# Altium PCB PCB1.PcbDoc
Units mil, origin at the board's own origin, x right, y up, seen from the top; angles counter-clockwise.
Board outline 3555 x 3550 mil, 2 copper layers (Top Layer, Bottom Layer); 54 components, 75 nets, 243 pads, 41 vias.
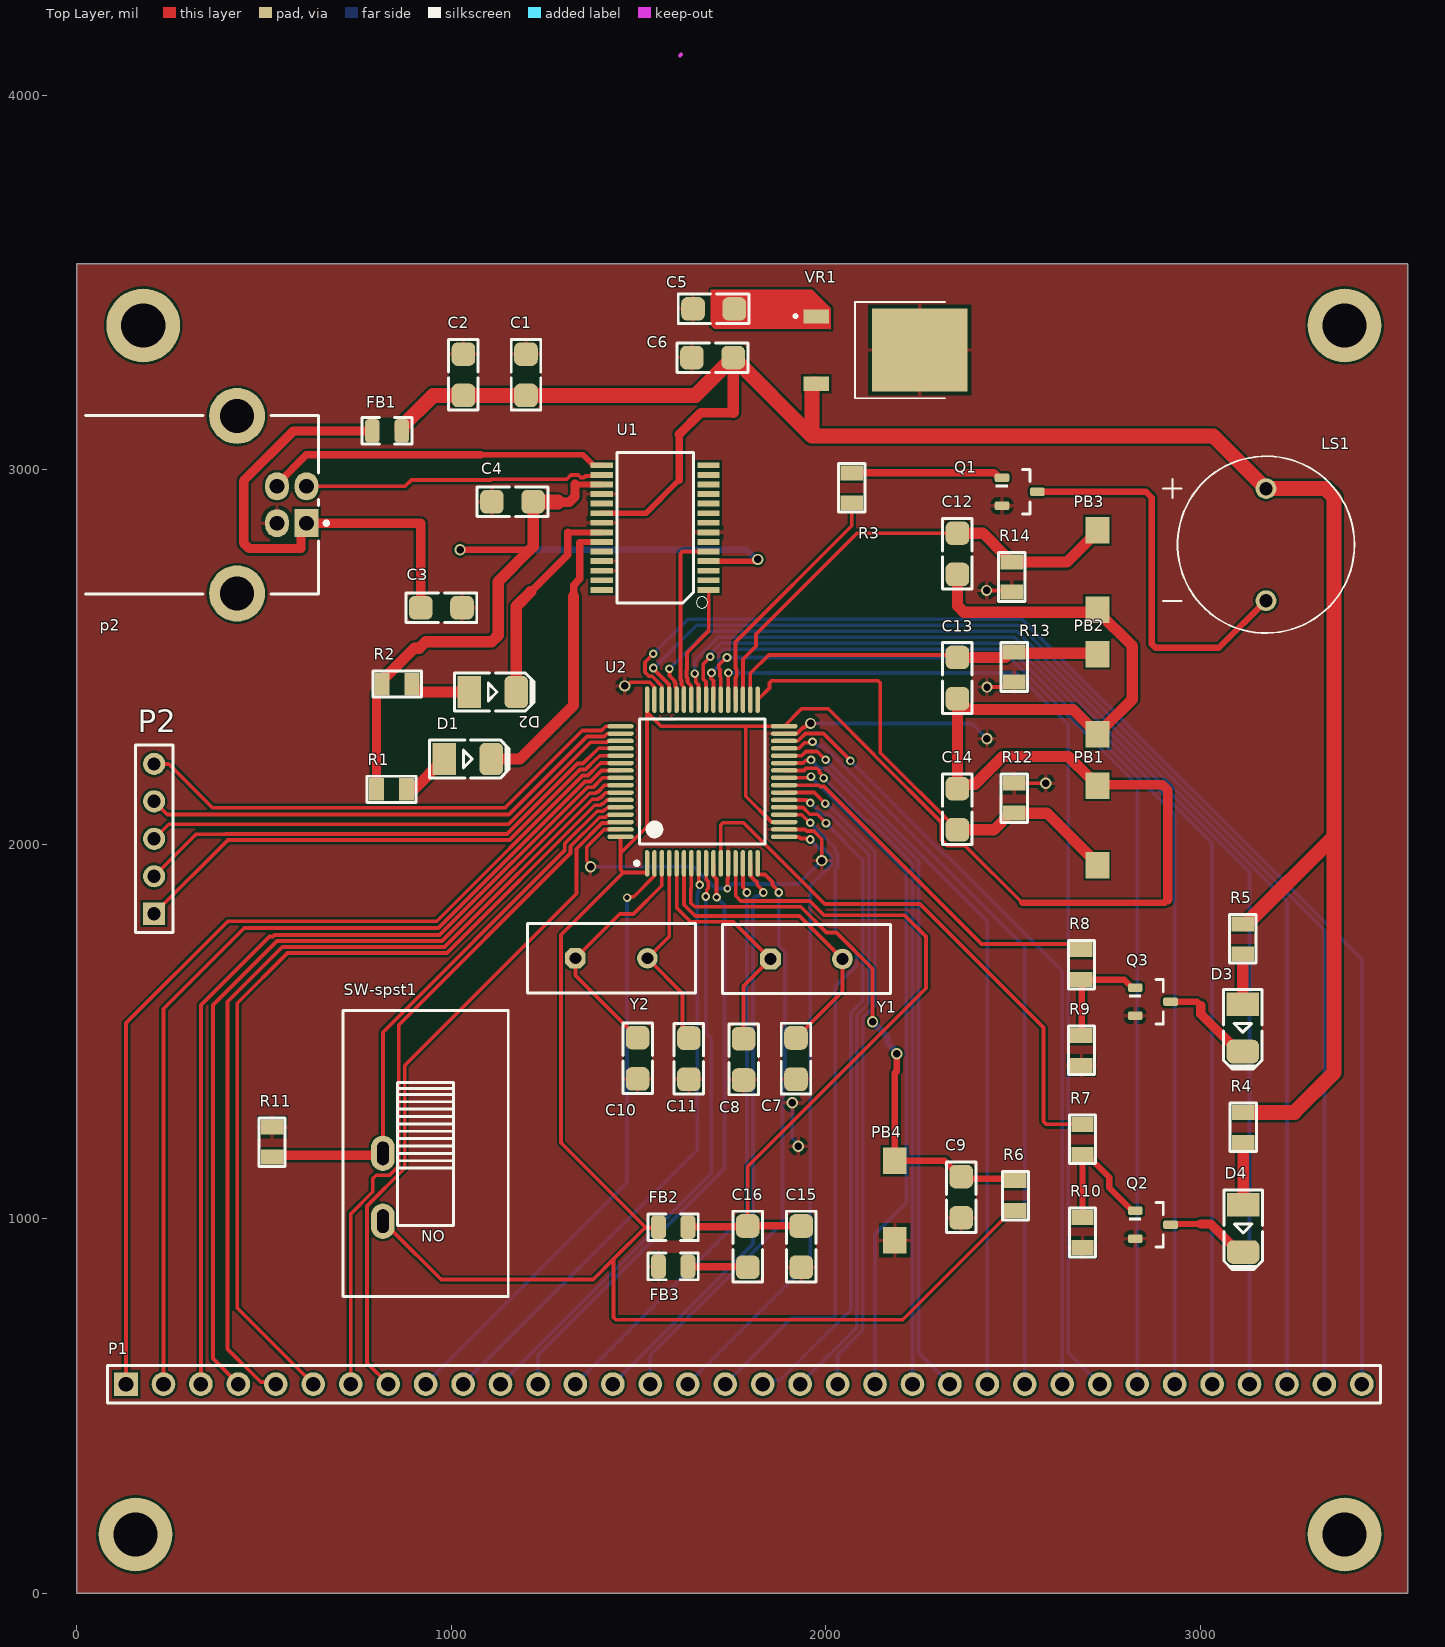
[diagram p0: Top Layer view]
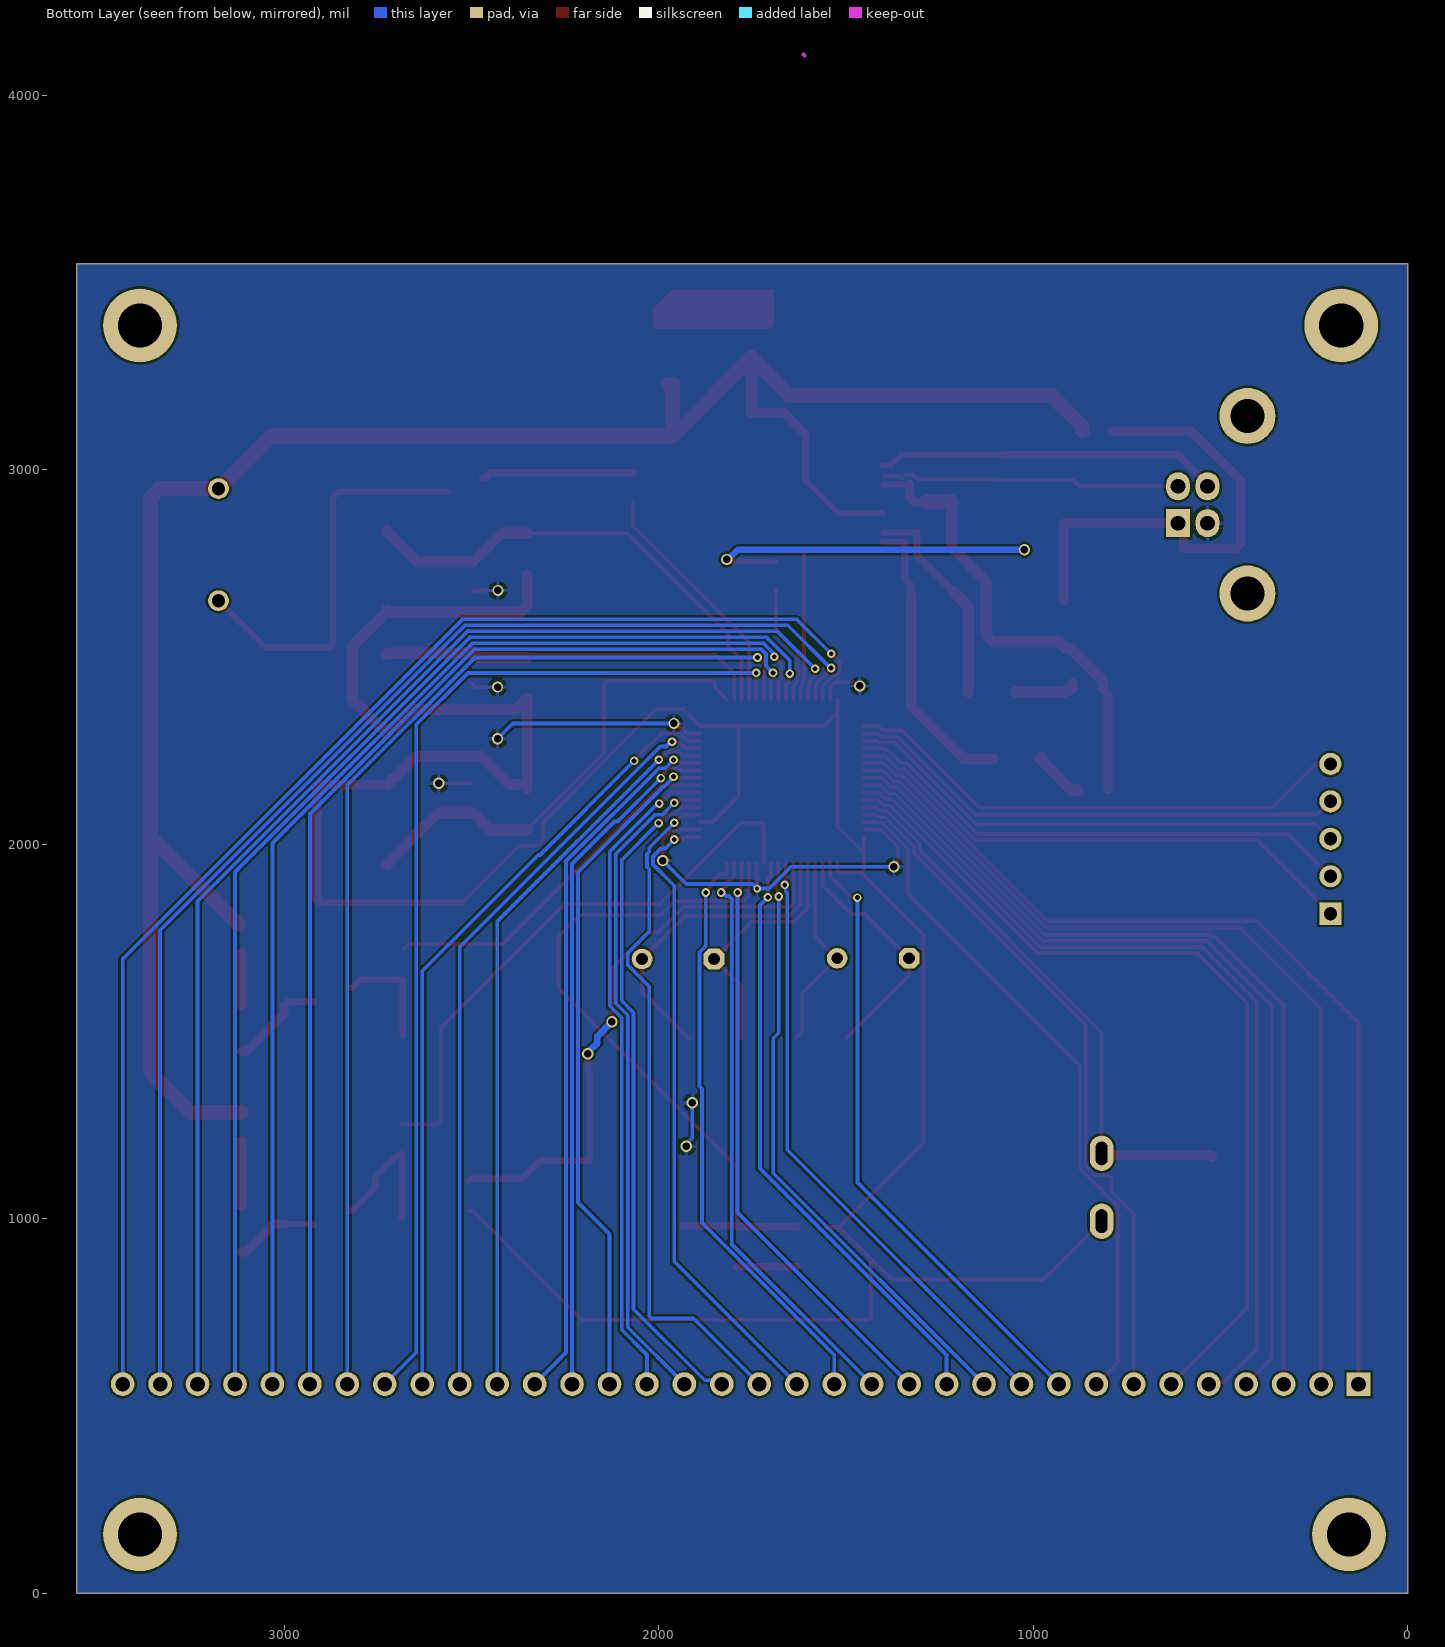
[diagram p1: Bottom Layer view, seen from below]
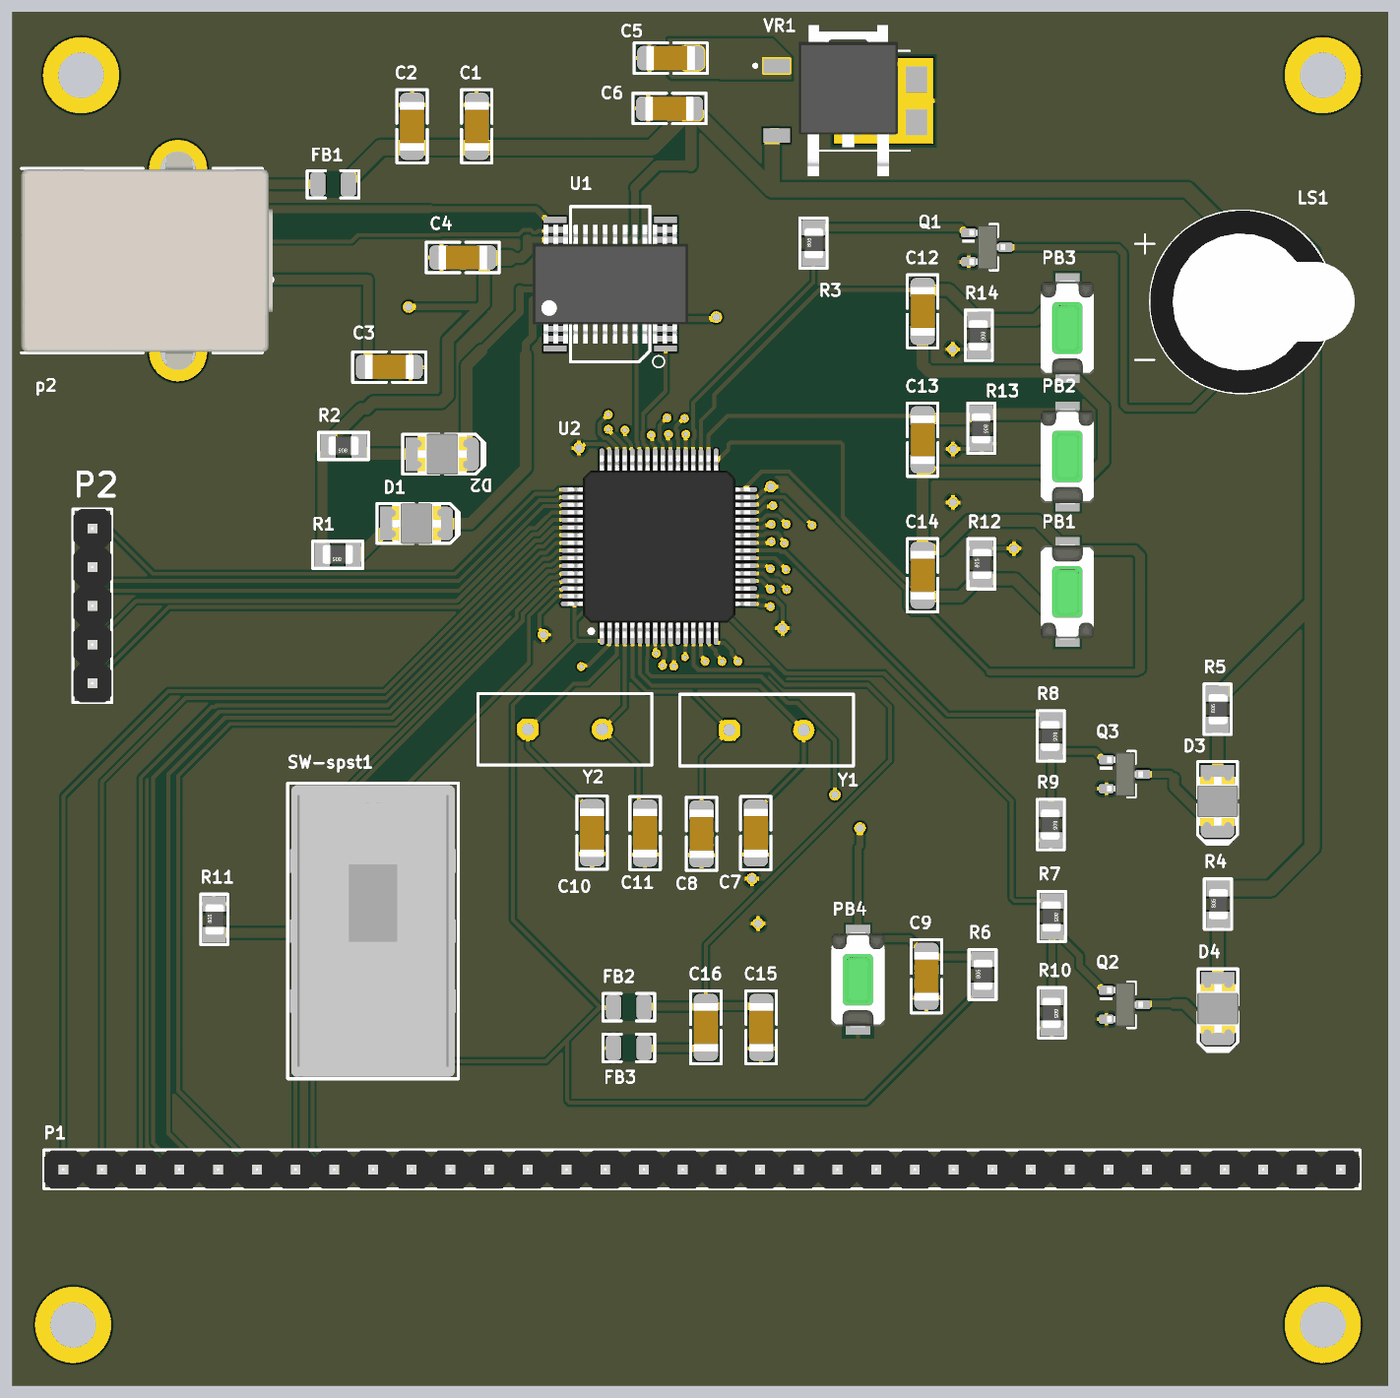
[diagram p2: 3D render of the assembled board from above, using the file's embedded part models]

## Layer stack, top to bottom
Top Solder: solder mask 0.4, Solder Resist, Dk 3.5
Top Layer: signal copper 1.4
Dielectric 1: dielectric 12.6, FR-4, Dk 4.8
Bottom Layer: signal copper 1.4
Bottom Solder: solder mask 0.4, Solder Resist, Dk 3.5

## Board outline
0,0 3555,0 3555,3550 0,3550

## Design rules (kind name [scope] priority, off if disabled: settings)
Clearance [All] p1: gap=5.91 ignorepadtopadclearanceinfootprint=FALSE
HoleSize [All] p1: absolutevalues=TRUE maxlimit=139.37 minlimit=1 maxpercent=80.000 minpercent=20.000
MinimumSolderMaskSliver [All] p1: minsoldermaskwidth=1.57
PolygonConnect [All] p1: connectstyle=Relief reliefconductorwidth=10 reliefentries=4 polygonreliefangle="90 Angle" airgapwidth=10
RoutingVias [All] p1: holewidth=15.75 width=62.99 viastyle="Through Hole" minholewidth=7.87 minwidth=19.68 maxholewidth=31.5 maxwidth=47.24
SilkToSilkClearance [All] p1: silktosilkclearance=5.51
SilkToSolderMaskClearance [IsPad] p1: minsilkscreentomaskgap=0 clearancetoexposedcopper=TRUE
SolderMaskExpansion [All] p1: expansion=4 istentingtop=FALSE
UnRoutedNet [All] p1: checkbadconnections=TRUE
Width [All] p1: maxlimit=40 minlimit=5.91 preferedwidth=9.84 minimp=50.000000 maximp=50.000000 favimp=50.000000
25 further rules are at their usual default settings.

## Components (designator, comment, footprint, x,y, rotation, side; value= is the part's Value field where it differs from the comment)
C1 "Capacitor C SMD 1206" C1206 1200,3254 r90 top value=100nf
C2 "Capacitor C SMD 1206" C1206 1033,3254 r90 top value=4.7uf
C3 "Capacitor C SMD 1206" C1206 974.12,2632 r0 top value=10nf
C4 "Capacitor C SMD 1206" C1206 1164,2915 r180 top value=100nf
C5 "Capacitor C SMD 1206" C1206 1701.12,3430 r0 top value=330nf
C6 "Capacitor C SMD 1206" C1206 1698.12,3300 r0 top value=100nf
C7 "Capacitor C SMD 1206" C1206 1921,1428 r90 top value=18pf
C8 "Capacitor C SMD 1206" C1206 1781,1426 r90 top value=18pf
C9 "Capacitor C SMD 1206" C1206 2362,1057.88 r90 top value=100nf
C10 "Capacitor C SMD 1206" C1206 1498,1429 r90 top value=18pf
C11 "Capacitor C SMD 1206" C1206 1635,1427.88 r90 top value=18pf
C12 "Capacitor C SMD 1206" C1206 2352,2776 r90 top value=100nf
C13 "Capacitor C SMD 1206" C1206 2352,2444.31 r90 top value=100nf
C14 "Capacitor C SMD 1206" C1206 2352,2094.01 r90 top value=100nf
C15 "Capacitor C SMD 1206" C1206 1935,926 r270 top value=10uf
C16 "Capacitor C SMD 1206" C1206 1792,926 r90 top value=100nf
D1 "LED SMD 1210" "LED SMD 1210 (Yellow)" 1044.5,2228 r0 top
D2 "LED SMD 1210" "LED SMD 1210 (Yellow)" 1111.01,2407 r0 top
D3 "LED SMD 1210" "LED SMD 1210 (Yellow)" 3114,1510 r270 top
D4 "LED SMD 1210" "LED SMD 1210 (Yellow)" 3115,974.5 r270 top
FB1 "Inductor SMD NC 0806" L0806 829,3104 r0 top
FB2 "Inductor SMD NC 0806" L0806 1593,978 r0 top
FB3 "Inductor SMD NC 0806" L0806 1593,873 r0 top
LS1 "AI-1223-TWT-5V-R" XDCR_AI-1223-TWT-5V-R 3176,2800.39 r0 top value=1K
P1 "Header 34" "HDR 1X34" 132,559 r0 top
P2 "Header 5" "HDR 1X5" 207,1815 r90 top
p2 "USB" USB2.5-2H4F 23,2907 r180 top
PB1 "SW_PB2" SMD_ALPS_SKQMBBE010 2726.01,2050.7 r90 top
PB2 "SW_PB2" SMD_ALPS_SKQMBBE010 2725.99,2401 r270 top
PB3 "SW_PB2" SMD_ALPS_SKQMBBE010 2725.99,2732.69 r270 top (schematic designator PB?)
PB4 "SW_PB2" SMD_ALPS_SKQMBBE010 2185,1049 r270 top
Q1 "BC817 NPN" SOT-23 2518.24,2941.6 r0 top value=BC817
Q2 "BC817 NPN" SOT-23 2874,984.5 r0 top value=BC817
Q3 "BC817 NPN" SOT-23 2874,1580 r0 top value=BC817
R1 "Resistor SMD 0805" SMD-0805-RES 841,2147 r90 top value=270
R2 "Resistor SMD 0805" SMD-0805-RES 856,2428 r90 top value=270
R3 "Resistor SMD 0805" SMD-0805-RES 2070,2952 r0 top value=10K
R4 "Resistor SMD 0805" SMD-0805-RES 3115,1244.5 r0 top value=680
R5 "Resistor SMD 0805" SMD-0805-RES 3114,1748 r0 top value=680
R6 "Resistor SMD 0805" SMD-0805-RES 2507,1062 r0 top value=10K
R7 "Resistor SMD 0805" SMD-0805-RES 2686,1212.5 r180 top value=10K
R8 "Resistor SMD 0805" SMD-0805-RES 2683,1679 r180 top value=10K
R9 "Resistor SMD 0805" SMD-0805-RES 2683,1450 r180 top value=10K
R10 "Resistor SMD 0805" SMD-0805-RES 2686,963.5 r180 top value=10K
R11 "Resistor SMD 0805" SMD-0805-RES 522,1205 r0 top value=10K
R12 "Resistor SMD 0805" SMD-0805-RES 2504,2123.43 r0 top value=4.7K
R13 "Resistor SMD 0805" SMD-0805-RES 2504,2473.73 r180 top value=4.7K
R14 "Resistor SMD 0805" SMD-0805-RES 2497,2714 r180 top value=4.7K
SW-spst1 "SW SPDT 1" SWSLIDT_SPST_S_19X11 932.17,1175 r90 top
U1 "INTERFACE-FT232RL(SSOP28)" SSOP28-0.65-10.2X5.2MM 1545,2846 r90 top
U2 "STM32F103RET6" STM-LQFP64_N 1671,2168 r90 top
VR1 "LM78M05CDT/NOPB" TO228P991X255-3N 2160,3320 r0 top
Y1 "8MHz" HC-49U 1949,1694 r0 top
Y2 "32.768kHz" HC-49U 1428.06,1696 r0 top

## Footprints (in the part's own frame and the unit in brackets; to place one, negate y for a bottom-side part, rotate by r counter-clockwise, add the part's x,y. Pads: shape width x height; smd on the part's side, far side on the other; paste and mask are expansions set on the pad)
C1206 [mm] "CHIP Capacitor, 3.2X1.6mm, 1206 www.smartw.ir"
  rrect50% 1.6x1.6 smd mask+0.075: 1(-1.4,0) 2(1.4,0)
  Top Layer pour cut-out: -0.8,1 -0.8,-1 0.8,-1 0.8,1
  silkscreen extent -2.4,-1 2.4,1, body extent -1.6,-0.8 1.6,0.8, height 1
HC-49U [mm] "Quartz Crystal, Thru-Hole; 2 Leads; Body 11.35 x 4.65 x 13.46 mm (LxWxH max)"
  oct 1.4x1.4 hole 0.8: 1(-2.44,0)
  round 1.4 hole 0.8: 2(2.44,0)
  silkscreen extent -5.7,-2.35 5.7,2.35
"HDR 1X5" [mm] "Connector; Header; 5 Position"
  rect 1.5x1.5 hole 0.9: 1(0,0)
  round 1.5 hole 0.9: 2(2.54,0) 3(5.08,0) 4(7.62,0) 5(10.16,0)
  silkscreen extent -1.27,-1.27 11.43,1.27, body extent -1.26,-1.27 11.43,1.26, height 8.51
"HDR 1X34" [mm] "Connector; Header; 34 Position"
  rect 1.6x1.6 hole 0.99: 1(0,0)
  round 1.6 hole 0.99: 2(2.54,0) 3(5.08,0) 4(7.62,0) 5(10.16,0) 6(12.7,0) 7(15.24,0) 8(17.78,0) 9(20.32,0) 10(22.86,0) 11(25.4,0) 12(27.94,0) 13(30.48,0) 14(33.02,0) 15(35.56,0) 16(38.1,0) 17(40.64,0) 18(43.18,0) 19(45.72,0) 20(48.26,0) 21(50.8,0) 22(53.34,0) 23(55.88,0) 24(58.42,0) 25(60.96,0) 26(63.5,0) 27(66.04,0) 28(68.58,0) 29(71.12,0) 30(73.66,0) 31(76.2,0) 32(78.74,0) 33(81.28,0) 34(83.82,0)
  silkscreen extent -1.27,-1.27 85.09,1.27, body extent -1.26,-1.27 85.09,1.26, height 8.51
L0806 [mm] "INDUCTOR, FERRITE BEAD, 0805, 2.0X1.6mm (www.Smartw.ir)"
  rrect50% 1x1.6 smd mask+0.075: 1(-1,0) 2(1,0)
  Top Layer pour cut-out: -0.7,0.9 0.7,0.9 0.7,-0.9 -0.7,-0.9
  silkscreen extent -1.7,-0.9 1.7,0.9, body extent -1,-0.8 1,0.8, height 1
"LED SMD 1210 (Yellow)" [mm] "(www.Smartw.ir)"
  rect 1.6x2.2 smd mask+0.075: 1(-1.6,0)
  rrect50% 1.6x2.2 smd mask+0.075: 2(1.6,0)
  Top Layer pour cut-out: -0.8,1.3 -0.8,-1.3 0.8,-1.3 0.8,1.3
  silkscreen extent -2.6,-1.3 2.8,1.3, body extent -1.62,-1.35 1.62,1.35, height 1.1
SMD-0805-RES [mil]
  rect 60x40 smd: 1(0,40) 2(0,-40)
  silkscreen extent -35,-65 35,65, body extent -24,-39 26,39, height 31
SMD_ALPS_SKQMBBE010 [mm] "Vertical 6.0X3.5 mm Compact Type (SurfaceMount) SKQM Series ; Height 5.0 mm ; 50,000 Cycles ; 1.57N Force"
  rect 1.8x1.6 smd mask-1.27: 1(-2.7,0) 2(2.7,0)
  body extent -3.15,-1.75 3.15,1.75, height 5.03
SOT-23 [mm] "SOT23, 3-Leads, Body 2.9x1.3mm, Pitch 0.95mm, Lead Span 2.5mm, IPC Medium Density (www.Smartw.ir)"
  rrect50% 1x0.6 smd: 1(-1.2,0.95) 2(-1.2,-0.95) 3(1.2,0)
  silkscreen extent -1.62,-1.5 0.7,1.5, body extent -1.16,-1.45 1.21,1.45, height 1
SSOP28-0.65-10.2X5.2MM [mm]
  rect 0.4x1.5 smd: 1(-4.225,-3.625) 2(-3.575,-3.625) 3(-2.925,-3.625) 4(-2.275,-3.625) 5(-1.625,-3.625) 6(-0.975,-3.625) 7(-0.325,-3.625) 8(0.325,-3.625) 9(0.975,-3.625) 10(1.625,-3.625) 11(2.275,-3.625) 12(2.925,-3.625) 13(3.575,-3.625) 14(4.225,-3.625) 15(4.225,3.625) 16(3.575,3.625) 17(2.925,3.625) 18(2.275,3.625) 19(1.625,3.625) 20(0.975,3.625) 21(0.325,3.625) 22(-0.325,3.625) 23(-0.975,3.625) 24(-1.625,3.625) 25(-2.275,3.625) 26(-2.925,3.625) 27(-3.575,3.625) 28(-4.225,3.625)
  silkscreen extent -5.46,-3.56 5.1,2.6, body extent -3.9,-5.1 3.9,5.1, height 2
STM-LQFP64_N [mm] "Thin QFP, 64-Leads, Body 10x10mm, Pitch 0.5mm, IPC Medium Density (www.Smartw.ir)"
  oval 1.8x0.3 smd: 1(-5.55,3.75) 2(-5.55,3.25) 3(-5.55,2.75) 4(-5.55,2.25) 5(-5.55,1.75) 6(-5.55,1.25) 7(-5.55,0.75) 8(-5.55,0.25) 9(-5.55,-0.25) 10(-5.55,-0.75) 11(-5.55,-1.25) 12(-5.55,-1.75) 13(-5.55,-2.25) 14(-5.55,-2.75) 15(-5.55,-3.25) 16(-5.55,-3.75) 33(5.55,-3.75) 34(5.55,-3.25) 35(5.55,-2.75) 36(5.55,-2.25) 37(5.55,-1.75) 38(5.55,-1.25) 39(5.55,-0.75) 40(5.55,-0.25) 41(5.55,0.25) 42(5.55,0.75) 43(5.55,1.25) 44(5.55,1.75) 45(5.55,2.25) 46(5.55,2.75) 47(5.55,3.25) 48(5.55,3.75)
  oval 0.3x1.8 smd: 17(-3.75,-5.55) 18(-3.25,-5.55) 19(-2.75,-5.55) 20(-2.25,-5.55) 21(-1.75,-5.55) 22(-1.25,-5.55) 23(-0.75,-5.55) 24(-0.25,-5.55) 25(0.25,-5.55) 26(0.75,-5.55) 27(1.25,-5.55) 28(1.75,-5.55) 29(2.25,-5.55) 30(2.75,-5.55) 31(3.25,-5.55) 32(3.75,-5.55) 49(3.75,5.55) 50(3.25,5.55) 51(2.75,5.55) 52(2.25,5.55) 53(1.75,5.55) 54(1.25,5.55) 55(0.75,5.55) 56(0.25,5.55) 57(-0.25,5.55) 58(-0.75,5.55) 59(-1.25,5.55) 60(-1.75,5.55) 61(-2.25,5.55) 62(-2.75,5.55) 63(-3.25,5.55) 64(-3.75,5.55)
  silkscreen extent -5.67,-4.25 4.25,4.57, body extent -6,-6 6,6, height 1.6
SWSLIDT_SPST_S_19X11 [mm] "Switch, Slide, SPST, Straight, THD, 19X11mm (www.Smartw.ir)"
  oval 2.4x1.6 hole 0.8 slot 1.6 at 0 deg: 1(-4.6,2.9) 2(0,2.9)
  silkscreen extent -9.7,-5.6 9.7,5.6, body extent -9.56,-5.45 9.56,5.45, height 14.11
TO228P991X255-3N [mm]
  rect 1.73x0.96 smd: 1(-4.7,2.285) 3(-4.7,-2.285)
  rect 6.49x5.63 smd paste-4: 4(2.32,0)
  silkscreen extent -6.2,-3.27 4.04,3.27, body extent -3.27,-4.95 3.27,4.95, height 2.55
USB2.5-2H4F [mm] "Connector; USB1.1, Type B, Thru-Hole; 4 Position; Right Angle"
  rect 1.6x1.9 hole 1: 1(-15.01,1.25)
  oval 1.6x1.9 hole 1: 2(-15.01,-1.25) 3(-13.01,-1.25) 4(-13.01,1.25)
  round 3.8 hole 2.3: 5(-10.3,6.02) 6(-10.3,-6.02)
  silkscreen extent -16.49,-6.05 -0.02,6.05, body extent -16.51,-7.45 -0.01,7.45, height 10.95
XDCR_AI-1223-TWT-5V-R [mm]
  round 1.408 hole 0.9: N(0,-3.8) P(0,3.8)
  silkscreen extent -6.98,-6 6,6, body extent -6.01,-6 7.43,6, height 5.36

## Part data
LS1: "INDICATOR 5VDC 85DB 2300HZ", Package="2225 PUI Audio", Check_prices=https://www.snapeda.com/parts/AI-1223-TWT-5V-R/PUI+Audio%252C+Inc./view-part/?ref=eda, MF="PUI Audio", MP=AI-1223-TWT-5V-R, SnapEDA_Link=https://www.snapeda.com/parts/AI-1223-TWT-5V-R/PUI+Audio%252C+Inc./view-part/?ref=snap
P1: "Header, 34-Pin", ComponentLinkp-URL=https://www.smartw.ir/
P2: "Header, 5-Pin", ComponentLinkp-URL=https://www.smartw.ir/, DatasheetVersion=2020
p2: "USB Connector-B Type", ComponentLink1Description="Website Smart World", ComponentLink1URL=https://www.smartw.ir/, ComponentLink2Description=Telegram, ComponentLink2URL=https://t.me/altium_smartw, ComponentLink3Description=Instagram, ComponentLink3URL=https://Instagram.com/smartgw.ir, DatasheetVersion=2021
PB1 PB2 PB3 PB4: "2 Pin Push Button Switch", Category=MISC, Company="SJ Libraries", ComponentLink1Description=Datasheet, Designer="Eng. Saeid Jorablo", HelpURL=http://s3.picofile.com/file/7443264187/Coming_Soon_logo.gif, Mounting Technology="Surface Mount\Through-Hole", Pin Count=0, Update Date=6/3/2012
Q1 Q2 Q3: "BJT, NPN, 45v, 0.5A, SMD, SOT23", ComponentLink1Description="Website Smart World", ComponentLink1URL=https://www.smartw.ir/, ComponentLink2Description=Telegram, ComponentLink2URL=https://t.me/altium_smartw, ComponentLink3Description=Instagram, ComponentLink3URL=https://Instagram.com/smartgw.ir, DatasheetVersion=2021
SW-spst1: "Toggle SPDT Switch with Body Hole", ComponentLink1Description="Website Smart World", ComponentLink1URL=https://www.smartw.ir/, ComponentLink2Description=Telegram, ComponentLink2URL=https://t.me/altium_smartw, ComponentLink3Description=Instagram, ComponentLink3URL=https://Instagram.com/smartgw.ir, DatasheetVersion=2021
U1: "USB-Ð¼Ð¾ÑÑ‚, Ð¸Ð½Ñ‚ÐµÑ€Ñ„ÐµÐ¹Ñ USB Ðº UART USB 2.0 UART 28-SSOP", Package="SSOP-28 FTDI", Availability="Not in stock", Check_prices=https://www.snapeda.com/parts/FT232RL/FTDI%252C+Future+Technology+Devices+International+Ltd/view-part/?ref=eda, MF="FTDI, Future", MP=FT232RL, Price=None, SnapEDA_Link=https://www.snapeda.com/parts/FT232RL/FTDI%252C+Future+Technology+Devices+International+Ltd/view-part/?ref=snap
U2: "ARM Cortex-M3 32-bit MCU, 512 KB Flash, 64 KB Internal RAM, 51 I/Os, 64-pin LQFP, -40 to 85 degC, Tray", ComponentLink1Description="Website Smart World", ComponentLink1URL=https://eshop.eca.ir/stm/1234-%D9%85%DB%8C%DA%A9%D8%B1%D9%88%DA%A9%D9%86%D8%AA%D8%B1%D9%84%D8%B1-stm32f103ret6.html, ComponentLink2Description="New link"
VR1: "500-mA, 35-V, linear voltage regulator for 5 V 3-TO-252 -40 to 125", Package="TO-252-3 Texas Instruments", Availability=Good, Check_prices=https://www.snapeda.com/parts/LM78M05CDT/Texas%20Instruments/view-part/563725/?ref=eda, MF="Texas Instruments", MP=LM78M05CDT, Price=None, Purchase-URL=https://pricing.snapeda.com/search/part/LM78M05CDT/?ref=eda, SnapEDA_Link=https://www.snapeda.com/parts/LM78M05CDT/Texas%20Instruments/view-part/563725/?ref=snap
Y1 Y2: library part ECS-44-20-1, "Crystal Oscillator", ComponentLink1Description="Manufacturer Link", ComponentLink1URL=http://www.ecsxtal.com/, ComponentLink2Description=Datasheet, ComponentLink2URL=http://www.ecsxtal.com/pdf2/HC49U.PDF, DatasheetDocument=18-Apr-2000, PackageReference=HC-49U, Published=17-Jul-2002, Publisher="Altium Limited"
C1 C2 C3 C4 C5 C6 C7 C8 C9 C10 C11 C12 C13 C14 C15 C16 D1 D2 D3 D4 R1 R2 R3 R4 R5 R6 R7 R8 R9 R10 R11 R12 R13 R14: ComponentLink1Description="Website Smart World", ComponentLink1URL=https://www.smartw.ir/, ComponentLink2Description=Telegram, ComponentLink2URL=https://t.me/altium_smartw, ComponentLink3Description=Instagram, ComponentLink3URL=https://Instagram.com/smartgw.ir, DatasheetVersion=2021
FB1 FB2 FB3: ComponentLink1Description="Website Smart World", ComponentLink1URL=https://www.smartw.ir/, ComponentLink2Description=Telegram, ComponentLink2URL=https://t.me/altium_smartw, ComponentLink3Description=Instagram, ComponentLink3URL=https://Instagram.com/smartgw.ir, DatasheetVersion=2021, FERRIT=FERRIT

## Free pads (board coordinates)
  round 196.85 hole 118.11: 1(178,3385.83) 2(157.48,157.48) 3(3385.83,157.48) 4(3385.83,3385.83)

## Via types
v1: diameter 23, hole 13, Top Layer to Bottom Layer, 26 vias
v2: diameter 30, hole 20, Top Layer to Bottom Layer, 14 vias
v3: diameter 20, hole 11, Top Layer to Bottom Layer, 1 vias

## Nets (pads, with @x,y where several pads share a name; then routed paths per layer and width w, separated by ;. In a path a pad name is that pad's centre, name@x,y a point inside that pad or via, vN(x,y) a via of type N, cw(c..) or ccw(c..) an arc to the next point about the centre after c; other vN are vias at no path point)
3V3A: C15.1 C16.2 FB2.2 U2.13 | length 1913.8
  Top Layer w10: U2.13 1759.93,1949.15 1759.93,1862.86 1773.6,1849.19 1957.81,1849.19 1996,1811 2211,1811 2267.91,1754.09 2267.91,1615.91 1792,1140 C16.2
  Top Layer w20: FB2.2 1633.93,979.56 1790.44,979.56 C16.2 C15.1
+3V3: C12.1 C13.1 C14.2 FB2.1 PB1.2 PB2.2 PB3.2 R6.2 SW-spst1.1 U2.1 U2.19 U2.32 U2.48 U2.64 | length 8460.5
  Top Layer w10: SW-spst1.1 818,992.49 842.48,968.01 843.89,968.01 973.49,838.41 1379.35,838.41 1434,893.06 ; U2.64 1452.5,1976.4 ; 1518.94,975 1550.63,975 FB2.1 1518.94,978 ; U2.1 1523.36,1925.8 1522.53,1924.97 1459.97,1924.97 ; U2.19 1889.16,2060.08 1855.54,2060.08 1787,2128.62 1787,2315.64 ; R6.2 2497,1022 2206,731 1439.86,731 1434,736.86 1434,893.06 ; 2525,1844 2372.51,1996.49 2325.21,1996.49 2309.6,2012.1 2309.6,2058.8 2130.09,2238.3 2130.09,2238.91 2007,2362 1935.87,2362 U2.32 1787,2315.64 ; 1434,893.06 1518.94,978 ; 1452.5,1976.4 1523.36,2047.27 U2.48 1523.71,2386.16 1523.71,2352.54 1560.61,2315.64 1787,2315.64 ; 1452.5,1976.4 1452.5,1932.44 1459.97,1924.97 ; 1459.97,1924.97 1293.54,1758.54 1293.54,1203.41 1518.94,978
  Top Layer w17: 2525,1844 2906,1844 2914.03,1852.03
  Top Layer w25: PB1.2@2726,2158.97 2899.39,2158.97 2914.03,2144.32 2914.03,1852.03
  Top Layer w30: C12.1 2352,2637.57 2369.57,2620 2719.61,2620 PB3.2 ; PB1.2 2726,2158.97 2726,2160.94 2709.5,2177.43 2705.57,2177.43 2648,2235 2473,2235 2398.27,2160.27 2363.14,2160.27 C14.2 C13.1 2352.4,2389.19 2381.59,2360 2660.7,2360 2705.57,2315.13 2709.5,2315.13 PB2.2@2726,2298.64 ; PB2.2 PB2.2@2726,2298.64 ; PB3.2@2726,2622.46 2819,2529.46 2819,2387.7 2746.43,2315.13 2742.5,2315.13 PB2.2@2726,2298.64
+5V0: C1.1 C2.1 C6.2 FB1.2 LS1.P R4.1 R5.1 U1.20 VR1.3 | length 5717.3
  Top Layer w15: U1.20 1520.39,2884.39 1609,2973
  Top Layer w20: 1609,2973 1609,3095
  Top Layer w25: 1609,3095 1667,3153 1753,3153
  Top Layer w30: 1753,3153 1753.24,3153.24 C6.2
  Top Layer w40: FB1.2 868.37,3115.18 952.07,3198.88 C2.1 C1.1 1652.12,3198.88 C6.2 1963.24,3090 ; VR1.3 1964.34,3230.04 1963.24,3228.94 1963.24,3090 ; R4.1 3251.5,1284.5 3358,1391 3358,2022 ; R5.1@3124,1788 3358,2022 ; 1963.24,3090 3036,3090 LS1.P 3334.57,2950 3358,2926.57 3358,2022
+12: C5.2 VR1.1
BUZZER: R3.2 U2.36 | length 656.7
  Top Layer w10: U2.36 1759.58,2445.59 1762.72,2448.72 1762.72,2467.28 1759.58,2470.41 1759.58,2540.58 2070,2851 R3.2
GND: C1.2 C2.2 C3.2 C4.2 C5.1 C6.1 C7.1 C8.1 C9.1 C10.1 C11.1 C15.2 FB3.1 p2.4 PB4.2 Q1.2 Q2.2 Q3.2 R9.1 R10.1 R11.1 R12.1 R13.1 R14.1 U1.7 U1.18 U1.21 U1.25 U1.26 U2.12 U2.18 U2.31 U2.47 U2.63 VR1.4 | length 2118.3
  Top Layer w10: v2(1372.47,1940.29) 1372.47,1945.68 1362,1956.15 1362,1993 1409.05,2040.05 U2.63@1449,2040.05 ; v2(1464,2423) 1469.41,2423 1479.25,2432.84 1530.33,2432.84 1542.7,2420.47 1542.7,2386.85 U2.47 ; v3(1738,1882) 1738,1907 1739.55,1908.55 1739.55,1949.15 U2.12 ; U2.18 1945.27,2040.05 1949.72,2035.59 1968.28,2035.59 1990,2013.88 v2(1990,1957) ; U2.31 1889.85,2296.3 1923.47,2296.3 1939.48,2312.31 1943.9,2312.31 1954.59,2323 v2(1960,2323) ; v2(2430,2678) 2493,2678 R14.1 ; v2(2431,2420) 2490.27,2420 R13.1 ; R12.1 2504.43,2163 v2(2588,2163)
  Bottom Layer w10: v2(1372.47,1940.29) 1647.39,1940.29 1705.69,1882 v3(1738,1882) 1750,1894 1927,1894 v2(1990,1957) ; v2(1911,1310) 1911,1215.41 1927,1199.41 v2(1927,1194) ; v2(1960,2323) 2390.17,2323 v2(2430.82,2282.36)
LED1: R7.2 U2.11 | length 1551.5
  Top Layer w10: U2.11 1720.21,2052.14 1726.07,2058 1781,2058 1998,1841 2252,1841 2582,1511 2582,1260 2589.5,1252.5 R7.2
LED2: R8.2 U2.24 | length 975.4
  Top Layer w10: U2.24 1981.98,2158.16 1985.63,2154.5 1995.5,2154.5 2416,1734 2668,1734 R8.2
mcu_boot0: R11.2 SW-spst1.2 U2.60 | length 1517.4
  Top Layer w10: SW-spst1.2 818,1498.22 1303.19,1983.41 1303.19,2001.67 1390.19,2088.67 1405.64,2088.67 1409.42,2092.45 1411.93,2092.45 1418.24,2098.76 1452.15,2098.76 U2.60
  Top Layer w25: R11.2 527,1170 813,1170 SW-spst1.2
mcu_nrst: C9.2 PB4.1 R6.1 U2.7 | length 1550.3
  Top Layer w10: U2.7 1641.47,1882.02 1640.12,1880.67 1640.12,1843.56 1650.39,1833.28 1933.72,1833.28 2002.36,1764.64 2028.82,1764.64 2125.34,1668.12 v2(2125.34,1526.66)
  Top Layer w18: v2(2190.19,1441) 2190.19,1395.18 2185.01,1390 PB4.1 2317.94,1155.3 2360.24,1113 C9.2 2367.5,1107.5 2501.5,1107.5 R6.1
  Bottom Layer w18: v2(2125.34,1526.66) 2164.53,1487.47 2164.53,1469.9 2190.19,1444.25 v2(2190.19,1441)
MCU_RX1: U1.5 U2.43 | length 471.3
  Top Layer w10: U2.43 1621.44,2386.85 1621.44,2420.47 1615.13,2426.77 1615.13,2437.38 1612.38,2440.13 1612.38,2776.17 1618.24,2782.02 U1.5
MCU_TX1: U1.1 U2.42 | length 323.2
  Top Layer w10: U2.42 1641.13,2386.85 1641.13,2423.28 1631.04,2433.36 1631.04,2443.96 1628.28,2446.72 1628.28,2465.28 1629.91,2466.9 1629.91,2511.97 1687.72,2569.78 U1.1
NetC3_1: C3.1 FB1.1 p2.1 | length 1312
  Top Layer w25: FB1.1 579,3104 446,2971 446,2804.64 460.64,2790 599.3,2790 599.3,2843.14 p2.1 918.88,2857.79 C3.1@918.88,2649
NetC7_2: C7.2 U2.6 Y1.2 | length 855.9
  Top Layer w10: U2.6 1622.13,1949.15 1622.13,1839.05 1652.1,1809.08 1706.92,1809.08 1929.98,1809.08 Y1.2 2045.06,1607.18 C7.2
NetC8_2: C8.2 U2.5 Y1.1 | length 668.8
  Top Layer w10: U2.5 1602.45,1949.15 1602.45,1830.55 1639.82,1793.18 1753.76,1793.18 Y1.1 1781,1622.06 C8.2
NetC10_2: C10.2 U2.3 Y2.1 | length 651.4
  Top Layer w10: C10.2 1332,1650.12 Y2.1 1450.33,1814.33 1487.33,1814.33 1562.39,1889.39 1562.39,1949.15 U2.3
NetC11_2: C11.2 U2.4 Y2.2 | length 536.6
  Top Layer w10: U2.4 1582.42,1754.29 Y2.2 1618,1602.13 1618,1500 C11.2
NetC16_1: C16.1 FB3.2 | length 160.5
  Top Layer w20: FB3.2 1633.43,871.94 1790.94,871.94 C16.1
NetD1_1: D1.1 R1.2 | length 143
  Top Layer w30: R1.2 885,2143 896.51,2143 D1.1 D1.1@977.51,2232
NetD1_2: D1.2 U1.23 | length 779.1
  Top Layer w15: 1344,2805 1346.61,2807.61 U1.23
  Top Layer w20: 1327,2663 1327,2692 1344,2709 1344,2805
  Top Layer w30: D1.2 1183.99,2228 1327,2371.01 1327,2663
NetD2_1: D2.1 R2.2 | length 166.6
  Top Layer w30: R2.2 896,2418 901,2413 911,2413 917,2407 D2.1
NetD2_2: D2.2 U1.22 | length 574.1
  Top Layer w15: 1311,2833 1402.08,2833 U1.22
  Top Layer w20: 1213,2675 1311,2773 1311,2833
  Top Layer w30: D2.2 1174,2636 1213,2675
NetD3_1: D3.1 R5.2 | length 135
  Top Layer w30: D3.1 R5.2
NetD3_2: D3.2 Q3.3 | length 261.2
  Top Layer w17: Q3.3 2992,1580 3002,1570
  Top Layer w25: 3002,1570 3002,1547.2 3102.19,1447.01 D3.2
NetD4_1: D4.1 R4.2 | length 167
  Top Layer w30: D4.1 R4.2
NetD4_2: D4.2 Q2.3 | length 225.6
  Top Layer w17: Q2.3 2923.24,986.5 3002,986.5
  Top Layer w25: 3002,986.5 3028.2,986.5 3103.19,911.51 D4.2
NetLS1_N: LS1.N Q1.3 | length 1064.2
  Top Layer w17: Q1.3 2855.4,2941.6 2861.98,2935.02 2871,2926 2871,2534.96 2880.96,2525 3050.21,2525 LS1.N
Netp2_2: p2.2 U1.16 | length 806.7
  Top Layer w9.84: p2.2 877.21,2956.21 894.17,2973.17 1105.61,2973.17 1107.44,2975 1309.01,2975 1320.34,2986.33 1339.66,2986.33 1346.5,2979.48 1354.66,2979.48 1358.97,2983.8 1399.33,2983.8 U1.16
Netp2_3: p2.3 U1.15 | length 920.8
  Top Layer w9.84: 1079.18,3040.18 1082,3043
  Top Layer w15: 1079.18,3040.18 1352.79,3040.18 1380.63,3012.34 U1.15
  Top Layer w20: p2.3 535.2,2962.12 613.27,3040.18 1079.18,3040.18
NetQ1_1: Q1.1 R3.1 | length 406.4
  Top Layer w20: R3.1 2450.13,2992 2463.13,2979 Q1.1
NetQ2_1: Q2.1 R7.1 R10.2 | length 388.4
  Top Layer w17: R10.2 R7.1 2696,1172.5 2757.6,1110.91 2757.6,1083.19 2818.88,1021.91 Q2.1
NetQ3_1: Q3.1 R8.1 R9.2 | length 304.5
  Top Layer w17: R9.2 2684,1489 2684,1638 R8.1 2797.28,1639 2818.88,1617.4 Q3.1
PA0: P1.13 U2.14 | length 1584.7
  Top Layer w10: U2.14 1779.27,1885.84 1790,1875.11 v1(1790,1871.59)
  Bottom Layer w10: P1.13 1790,1017 v1(1790,1871.59)
PA1: P1.14 U2.15 | length 1580.9
  Top Layer w10: P1.14@1431,558 P1.14 ; U2.15 1799.3,1949.15 1799.3,1915.53 1813.09,1901.74 1815.26,1901.74 1817.43,1899.57 1817.43,1891.68 1834,1875.11 v1(1834,1871.59)
  Bottom Layer w10: P1.14 1805.91,932.91 1805.91,1854.91 1813.04,1862.04 1820.92,1862.04 1830.48,1871.59 v1(1834,1871.59)
PA2: P1.15 U2.16 | length 1582
  Top Layer w10: P1.15 P1.15@1533,558 ; U2.16 1818.64,1920.46 1819.47,1919.62 1838.38,1919.62 1858.43,1899.57 1858.43,1891.68 1875,1875.11 v1(1875,1871.59)
  Bottom Layer w10: P1.15 1532,636.51 1885.09,989.6 1885.09,1347.8 1891.4,1354.1 1891.4,1712.3 1875,1728.7 v1(1875,1871.59)
PA3: P1.16 U2.17 | length 1716
  Top Layer w10: U2.17 1889.85,2020.02 1928.66,2020.02 1932.99,2015.68 1956.51,2015.68 v1(1959,2013.19)
  Bottom Layer w10: P1.16 1959,886 1959,1889.36 2015.91,1946.27 2015.91,1967.73 1994.42,1989.22 1982.97,1989.22 v1(1959,2013.19)
PA4: P1.17 U2.20 | length 1845.6
  Top Layer w10: U2.20 1936.4,2079.42 1957.82,2058 v1(1959,2058)
  Bottom Layer w10: P1.17 1907,734 2020.14,734 2026,739.86 2026,1620.54 2083.53,1678.07 2083.53,1709.93 2026,1767.46 2026,1933.87 2031.81,1939.68 2031.81,1974.32 2026,1980.13 2026,1991 v1(1959,2058)
PA5: P1.18 U2.21 | length 1799.4
  Top Layer w10: U2.21 1889.85,2098.76 1939.56,2098.76 1957.91,2080.41 1977.59,2080.41 v1(2001,2057)
  Bottom Layer w10: P1.18 1842.14,569.14 1877.78,569.14 2067.62,758.99 2067.62,1550.57 2099.43,1582.38 2099.43,1958.57 v1(2001,2057)
PA6: P1.19 U2.22 | length 1777
  Top Layer w10: U2.22 1947.69,2118.79 1955.48,2111 v1(1959,2111)
  Bottom Layer w10: P1.19 2083.53,710.53 2083.53,1543.98 2115.34,1575.79 2115.34,1974.35 2010.28,2079.41 1990.59,2079.41 v1(1959,2111)
PA7: P1.20 U2.23 | length 1770
  Top Layer w10: U2.23 1969.53,2138.47 v1(1999,2109)
  Bottom Layer w10: v1(1999,2109) 2001.49,2106.51 2005.67,2106.51 2131.24,1980.94 2131.24,1569.2 2099.43,1537.39 2099.43,703.94 2032,636.51 P1.20
PA8: P1.31 U2.41 | length 3242.9
  Top Layer w10: v1(1650.69,2456) 1653.18,2453.51 1653.18,2433.72 1660.81,2426.08 1660.81,2386.85 U2.41
  Bottom Layer w10: v1(1650.69,2456) 1650.69,2491.38 1712.53,2553.22 2504.76,2553.22 3132,1925.97 P1.31
PA11: P1.32 U2.44 | length 3368.9
  Top Layer w10: v1(1583,2469) 1583,2450.49 1596.47,2437.02 1596.47,2433.71 1597.98,2432.2 1597.98,2432.04 1599.23,2430.79 1599.23,2419.4 1602.1,2416.52 U2.44
  Bottom Layer w10: v1(1583,2469) 1683.12,2569.12 2511.35,2569.12 3232,1848.47 P1.32
PA12: P1.33 U2.45 | length 3490
  Top Layer w10: v1(1540.29,2470.9) 1540.29,2468.71 1582.07,2426.93 1582.07,2386.85 U2.45
  Bottom Layer w10: v1(1540.29,2470.9) 1541.9,2470.9 1656.03,2585.03 2517.93,2585.03 3332,1770.96 P1.33
PA13: P1.34 U2.46 | length 3595.8
  Top Layer w10: v1(1540,2509) 1517.59,2486.59 1517.59,2459.72 1528.57,2448.75 1536.91,2448.75 1562.39,2423.28 1562.39,2386.85 U2.46
  Bottom Layer w10: v1(1540,2509) 1631.93,2600.93 2524.52,2600.93 3432,1693.46 P1.34
PA14: P2.5 U2.49 | length 1384.1
  Top Layer w10: P2.5 246,2215 363,2098 1144,2098 1350.3,2304.3 1401.92,2304.3 1412.92,2315.29 1452.15,2315.29 U2.49
PA15: P2.4 U2.50 | length 1349.4
  Top Layer w10: P2.4 242,2080 1154.31,2080 1362.7,2288.39 1408.51,2288.39 1415.72,2295.61 1452.15,2295.61 U2.50
PB0: P1.22 U2.26 | length 1844.5
  Top Layer w10: U2.26 1942.14,2197.53 1948.01,2203.41 1976.59,2203.41 1983.67,2196.33 1983.67,2191.67 1994.91,2180.43 v1(1994.91,2176.91)
  Bottom Layer w10: v1(1994.91,2176.91) 2110.61,2061.21 2118.79,2061.21 2232,1948 P1.22
PB1: P1.23 U2.27 | length 1905.3
  Top Layer w10: U2.27 1939.33,2217.21 1945.44,2223.32 1958.51,2223.32 v1(1961,2225.81)
  Bottom Layer w10: v1(1961,2225.81) 1983.41,2203.41 2000.1,2203.41 2247.91,1955.6 2247.91,643.09 P1.23
PB2: P1.24 U2.28 | length 1970.3
  Top Layer w10: U2.28 1936.52,2236.9 1947.84,2248.22 1977.78,2248.22 v1(2000,2226)
  Bottom Layer w10: v1(2000,2226) 2432,1794 P1.24
PB3: P1.2 U2.55 | length 2486.2
  Top Layer w10: P1.2 232,1561 448,1777 966.05,1777 1357.25,2168.2 1372.2,2168.2 1401.53,2197.53 U2.55
PB4: P1.3 U2.56 | length 2383.9
  Top Layer w10: P1.3 332,1571 515,1754 524.51,1754 528.41,1757.91 969.45,1757.91 1363.84,2152.29 1378.78,2152.29 1404.34,2177.84 U2.56
PB5: P1.4 U2.57 | length 2371.9
  Top Layer w10: P1.4 364,627 364,1571 535,1742 976.04,1742 1370.42,2136.39 1385.87,2136.39 1389.65,2140.17 1392.17,2140.17 1409.81,2157.81 1452.15,2157.81 U2.57
PB6: P1.5 U2.58 | length 2375.8
  Top Layer w10: P1.5 526.62,564.38 491.62,564.38 403,653 403,1580 549,1726 982.53,1726 1377.01,2120.48 1392.46,2120.48 1396.24,2124.26 1398.75,2124.26 1412.62,2138.13 1452.15,2138.13 U2.58
PB7: P1.6 U2.59 | length 2349.4
  Top Layer w10: P1.6 429,762 429,1576 563.09,1710.09 989.12,1710.09 1383.6,2104.57 1399.05,2104.57 1402.83,2108.35 1405.34,2108.35 1415.43,2118.44 1452.15,2118.44 U2.59
PB8: P1.7 U2.61 | length 1871.5
  Top Layer w10: P1.7 728,563 732,567 732,1013.29 791.09,1072.38 791.09,1107.53 800.41,1116.85 835.56,1116.85 860.4,1141.69 860.4,1518.13 1319.09,1976.82 1319.09,1995.08 1396.78,2072.76 1412.23,2072.76 1416.01,2076.54 1419.6,2076.54 1422.48,2079.42 U2.61
PB9: P1.8 U2.62 | length 1831.6
  Top Layer w10: P1.8 775.6,615.4 775.6,1034.39 876.31,1135.1 876.31,1409.31 1335,1868 1335,1988.49 1403.36,2056.86 1419.6,2056.86 1422.48,2059.73 U2.62
PB10: P1.25 U2.29 | length 2043.5
  Top Layer w10: U2.29 1889.85,2256.93 1929.08,2256.93 1943.67,2271.51 1962.51,2271.51 v1(1965,2274)
  Bottom Layer w10: v1(1965,2274) 1968.52,2274 1981.33,2261.19 1996.5,2261.19 2532,1725.69 P1.25
PB11: P1.26 U2.30 | length 2117.3
  Top Layer w10: U2.30 1889.85,2276.61 1926.28,2276.61 1946.07,2296.41 1994.08,2296.41 2066.19,2224.3 v1(2066.19,2223.19)
  Bottom Layer w10: v1(2066.19,2223.19) 2317.67,1971.7 2322.3,1971.7 2632,1662 P1.26
PC0: P1.10 U2.8 | length 1653.5
  Top Layer w10: U2.8 1661.16,1898.36 1664,1895.52 v1(1664,1892)
  Bottom Layer w10: P1.10 1657.59,1184.59 1657.59,1870.28 1661.51,1874.2 1661.51,1889.51 v1(1664,1892)
PC1: P1.11 U2.9 | length 1636.8
  Top Layer w10: P1.11 P1.11@1133.33,557.67 ; v1(1680,1861) 1682.49,1863.49 1682.49,1878.8 1686.41,1882.72 1686.41,1901.28 1681.19,1906.5 1681.19,1949.15 U2.9
  Bottom Layer w10: P1.11 1695,1122 1695,1482.24 1680,1497.24 v1(1680,1861)
PC2: P1.12 U2.10 | length 1610.4
  Top Layer w10: P1.12 P1.12@1233,558 ; U2.10 1700.87,1949.15 1700.87,1915.53 1709,1907.41 v1(1709,1859)
  Bottom Layer w10: P1.12 1232,636.51 1730,1134.51 1730,1838 v1(1709,1859)
PC5: P1.21 U2.25 | length 1836.4
  Top Layer w10: U2.25 1954.32,2177.84 1957.48,2181 v1(1961,2181)
  Bottom Layer w10: v1(1961,2181) 1961,2179.13 1985.63,2154.5 1987.5,2154.5 2216.09,1925.91 2216.09,1044.18 2132,960.08 P1.21
PC6: P1.27 U2.37 | length 2832.3
  Top Layer w10: U2.37 1740.1,2386.71 1740.1,2457.79 v1(1740.31,2458)
  Bottom Layer w10: v1(1740.31,2458) 2510,2458 2647.91,2320.09 2647.91,643.09 P1.27
PC7: P1.28 U2.38 | length 2960.7
  Top Layer w10: U2.38 1720.21,2446.41 1717.91,2448.72 1717.91,2467.28 1714.74,2470.45 1714.74,2478.74 1735,2499 v1(1736.81,2499)
  Bottom Layer w10: v1(1736.81,2499) 2491.49,2499 2832,2158.49 P1.28
PC8: P1.29 U2.39 | length 3060.6
  Top Layer w10: v1(1695.5,2458) 1693.68,2456.18 1693.68,2443.79 1700.53,2436.94 U2.39
  Bottom Layer w10: v1(1695.5,2458) 1714.41,2476.91 1714.41,2508.28 1727.53,2521.41 2491.58,2521.41 2932,2080.99 P1.29
PC9: P1.30 U2.40 | length 3150.5
  Top Layer w10: U2.40 1680.84,2434.13 1673.09,2441.88 1673.09,2482.09 v1(1692,2501)
  Bottom Layer w10: v1(1692,2501) 1694.49,2503.49 1694.49,2510.86 1720.94,2537.31 2498.17,2537.31 3032,2003.48 P1.30
PC10: P2.3 U2.51 | length 1353.7
  Top Layer w10: P2.3 246,2054 1153.08,2054 1371.56,2272.49 1415.1,2272.49 1418.53,2275.92 1452.15,2275.92 U2.51
PC11: P2.2 U2.52 | length 1387
  Top Layer w10: P2.2 319,2027 396.51,2027 397.41,2027.91 1149.47,2027.91 1337.48,2215.91 1352.43,2215.91 1381.24,2244.72 1382.22,2244.72 1394.09,2256.58 U2.52
PC12: P2.1 U2.53 | length 1420.3
  Top Layer w10: P2.1 404,2012 1156.06,2012 1344.07,2200.01 1359.02,2200.01 1387.82,2228.81 1388.81,2228.81 1396.9,2236.9 U2.53
PC13: P1.9 U2.2 | length 1655.3
  Top Layer w10: P1.9 P1.9@934,557 ; v1(1470.03,1858) 1472.52,1860.49 1487.66,1860.49 1542.7,1915.53 1542.7,1949.15 U2.2
  Bottom Layer w10: P1.9 1470.03,1097.03 v1(1470.03,1858)
PD2: P1.1 U2.54 | length 2572
  Top Layer w10: P1.1 132,1523 404,1795 961.56,1795 1350.66,2184.1 1365.61,2184.1 1394.41,2212.91 1395.4,2212.91 1399.71,2217.21 U2.54
PUSH_BUTTON1: C14.1 PB1.1 R12.2 U2.33 | length 1288.4
  Top Layer w10: U2.33 1850,2417.87 1850,2431.14 1855.86,2437 2140.14,2437 2146,2431.14 2146,2244.89 C14.1
  Top Layer w30: C14.1 2449.46,2038.89 2494,2083.43 R12.2 2590.91,2083.43 2726,1948.34 PB1.1
PUSH_BUTTON2: C13.2 PB2.1 R13.2 U2.34 | length 1029.1
  Top Layer w10: U2.34 1798.95,2456.95 1848,2506 2345.43,2506 C13.2
  Top Layer w30: C13.2 2479.69,2499.43 2494,2513.73 R13.2 2507.22,2510.52 2722.78,2510.52 PB2.1
PUSH_BUTTON3: C12.2 PB3.1 R14.2 U2.35 | length 1261
  Top Layer w10: U2.35 1779.64,2386.88 1779.64,2494.64 1814,2529 1814,2561 2084.12,2831.12 C12.2
  Top Layer w30: C12.2 2419.88,2831.12 R14.2@2482,2769 ; R14.2 2644.94,2754 2726,2835.06 PB3.1
VCCIO: C4.1 R1.1 R2.1 U1.4 U1.17 | length 2401.4
  Top Layer w15: 1331,2962 1331.84,2961.16 U1.17 ; U1.4 1810.37,2756.43 1814.94,2761 v2(1819,2761)
  Top Layer w17: v2(1024,2787) 1211,2787 1219.12,2795.12
  Top Layer w25: R1.1 801,2403 816,2418 R2.1 ; 1285,2914 1316.36,2914 1331,2928.64 1331,2962
  Top Layer w30: R2.1 816,2438 902,2524 915,2524 932,2541 1108.43,2541 1126,2558.57 1126,2702 1211,2787 ; 1219.12,2795.12 C4.1
  Top Layer w40: C4.1 1220.12,2914 1285,2914
  Bottom Layer w17: v2(1024,2787) 1789.48,2787 1815.48,2761 v2(1819,2761)
pads on no net: p2.5 p2.6 U1.2 U1.3 U1.6 U1.8 U1.9 U1.10 U1.11 U1.12 U1.13 U1.14 U1.19 U1.24 U1.27 U1.28

## Polygon pours and split planes (outlines as drawn)
GND on Top Layer "GND_L01_P002" (solid, remove dead copper, pour order 2): 0,0 3555,0 3555,3550 0,3550
GND on Top Layer "GND_L01_P005" (solid, pour order 5): 1556,2343 1566,2333 1596,2333 1587,2342 1591,2346 1596,2346
GND on Bottom Layer "GND_L02_P010" (solid, pour order 10): 0,0 3555,0 3555,3550 0,3550

## Keep-outs
Keep-Out Layer:
  lines w10: 1611,4106 1614,4109

## Other copper
Top Layer:
  region net +12: 2014,3375 2014,3432 1965,3481 1694,3481 1694,3386 1703,3377

## Text inside footprints (layer, text, board x,y; h text height)
p2: Mechanical 1 "PCB Edge" at 35.8,3129.5 h30 r270
SW-spst1: Top Overlay "NO" at 920.36,938.78 h30